# EAGLE board MeadowF7Micro_REVB (EAGLE 9.3.2), part 1 of 2
uMeadow eval Kit.
DATE: 09/16/2018; ENGINEER: S.JOHNSON; PART_NUMBER: uMeadow; REV: A
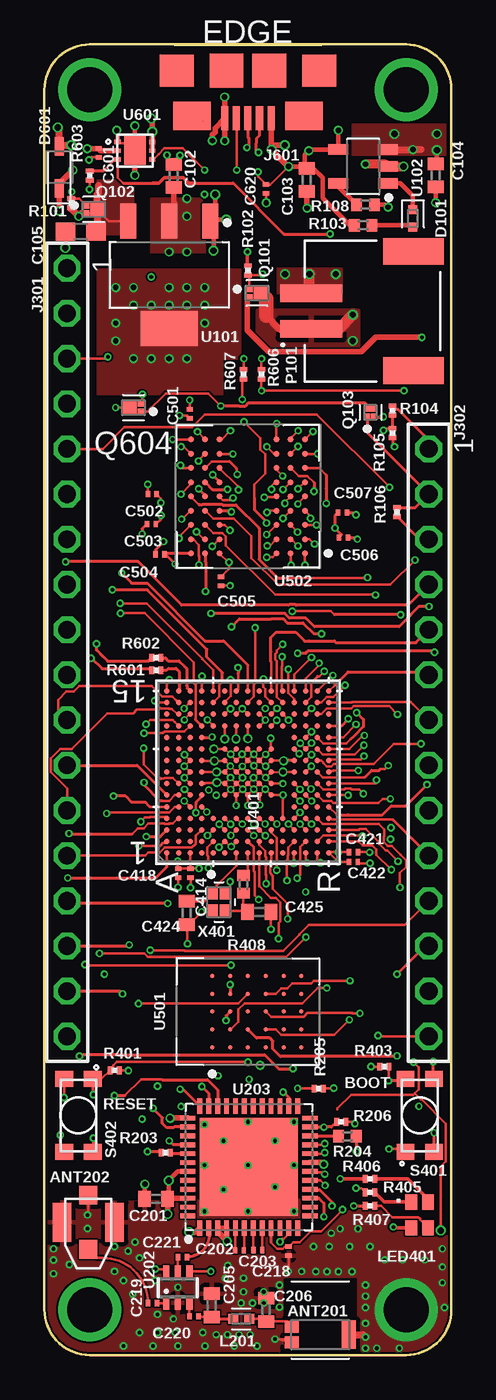
[diagram p0: board, top side]
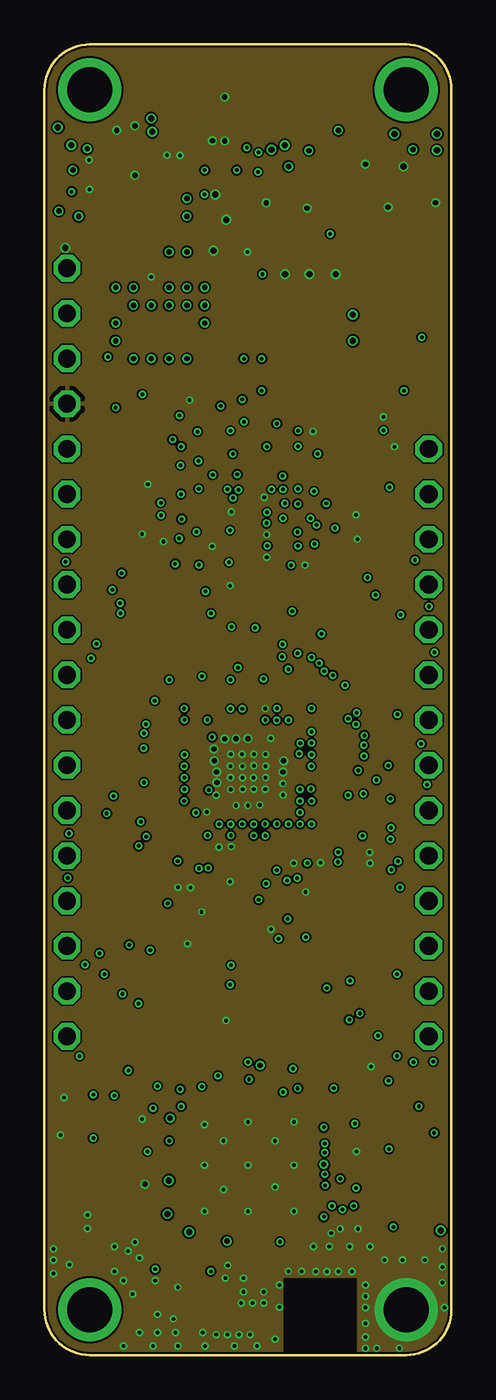
[diagram p1: board, inner layer Route2]
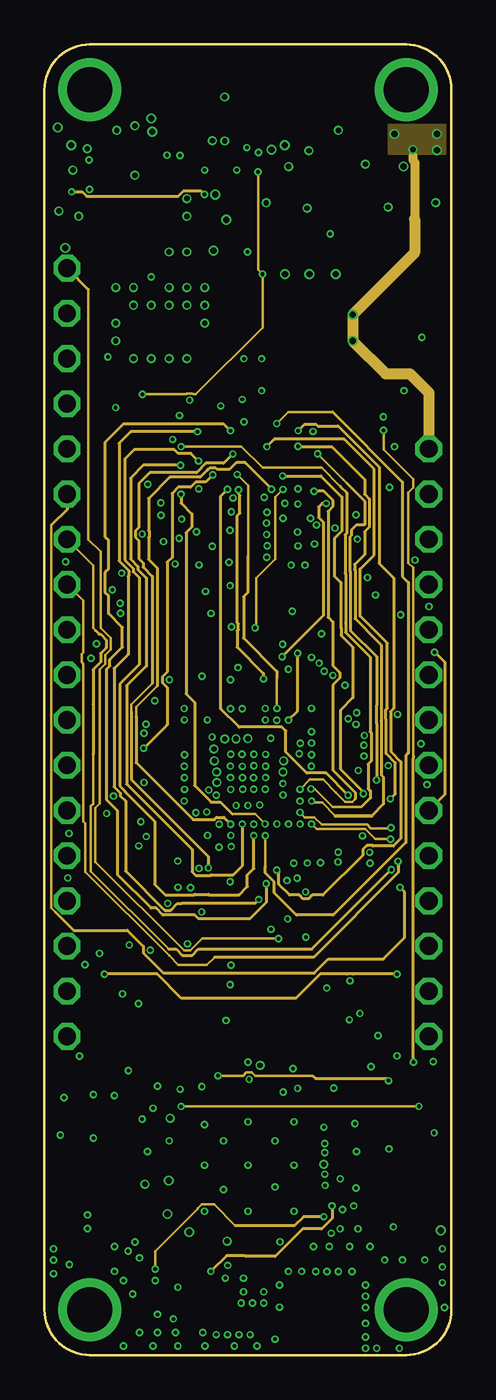
[diagram p2: board, inner layer Route3]
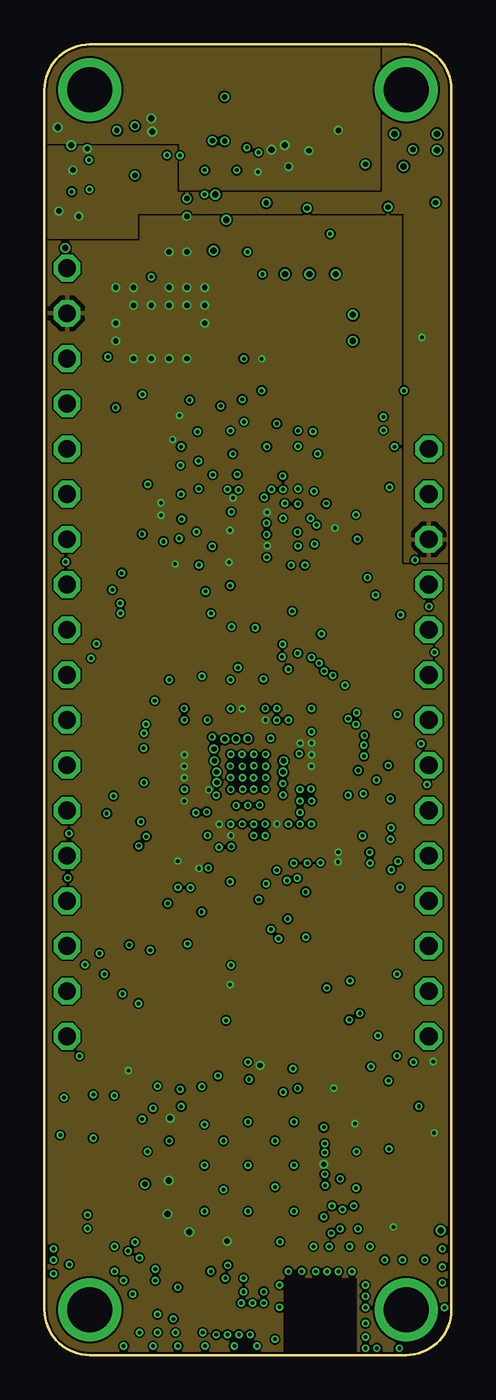
[diagram p3: board, inner layer Route14]
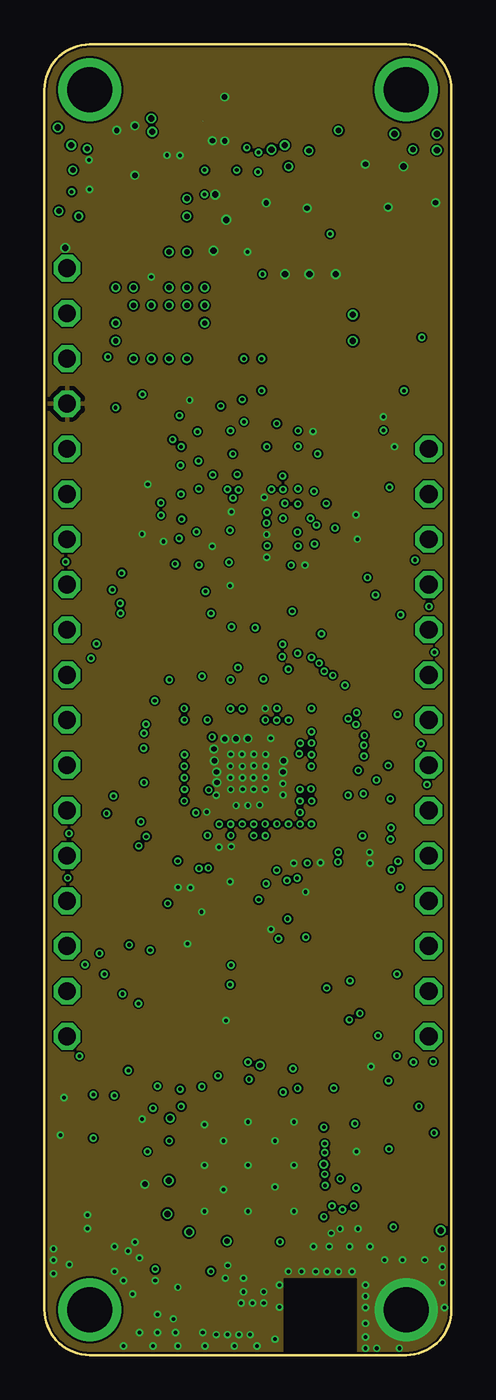
[diagram p4: board, inner layer Route15]
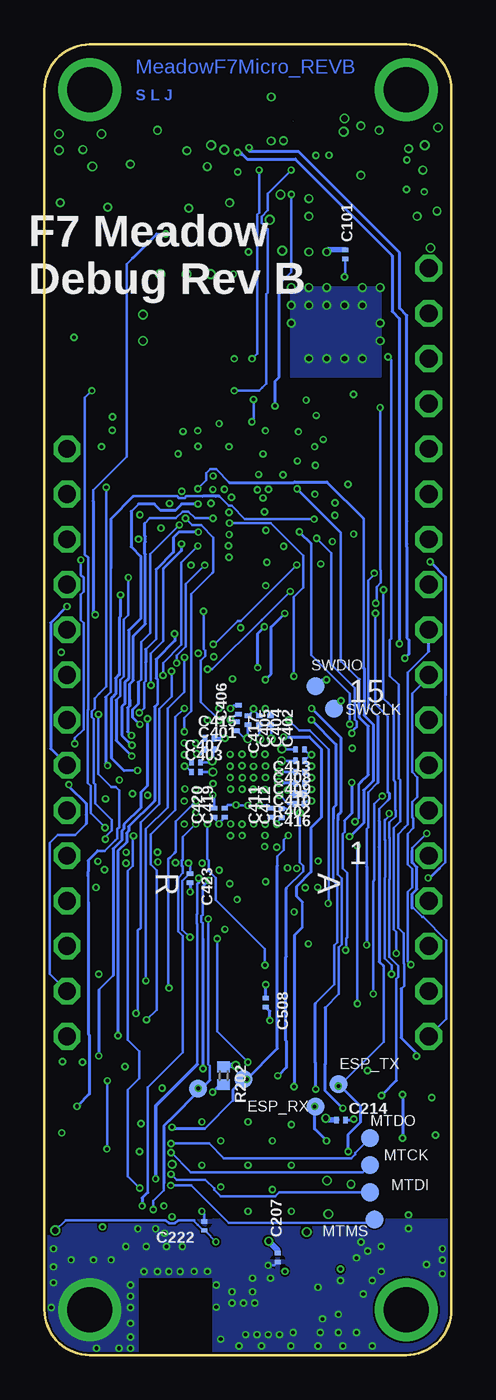
[diagram p5: board, bottom side, seen from below]

Size 22.86 x 73.66 mm. Coordinates in mm from the lower left corner, seen from the top.
Outline: 0,71.12 0,2.54 arc90 2.54,0 20.32,0 arc90 22.86,2.54 22.86,71.12 arc90 20.32,73.66 2.54,73.66 arc90 0,71.12
Copper layers (1*2+3*14+15*16): Top 0.035mm / dielectric 0.15mm / Route2 0.035mm / dielectric 0.15mm / Route3 0.035mm / dielectric 0.3mm / Route14 0.035mm / dielectric 0.15mm / Route15 0.035mm / dielectric 0.15mm / Bottom 0.035mm
Design rules "default *": minimum track width 5mil, minimum drill 0.2mm, track to track 0.1mm, track to pad 0.1mm, pad to pad 4mil, via to via 4mil, smd to smd 0mil, copper to edge 0.1mm, drill to drill 6mil, minimum pad ring 0.1mm, minimum via ring 4mil, stop-mask expansion 1mil, vias tented up to drill 20mil, thermal gap 10mil
Net classes: 1 USB: width 0.165 mm, drill 0.102 mm, clearance 0.254 mm; 2 MEM_ADDR_CNT: width 0.102 mm, drill 0.102 mm; 3 MEM_DATA: width 0.102 mm; 4 5V: width 0.1 mm; 5 50ohm: width 0.1 mm; 6 POWER: width 0.1 mm, drill 0.203 mm; 7 CLK: width 0.1 mm, drill 0.203 mm; 8 ANT: clearance 0.3 mm

## Footprints (pad centres in the part's own frame; a part is rotated, then mirrored left to right if it is on the bottom)
W3008 = smd 0.8 x 0.65: 1 1.6,-0.425; 2 1.6,0.425 | smd 0.8 x 1.6: 3 -1.6,0
A-1JB = smd 2.2 x 1.05: GND 0,1.475; GND2 0,-1.475 | smd 1.05 x 1: GND1 -1.525,0; SIG 1.525,0
C0201 = smd 0.25 x 0.35: 1 -0.25,0; 2 0.25,0
C0402 = smd 0.7 x 0.9: 1 -0.65,0; 2 0.65,0
C0603 = smd 1.1 x 1: 1 -0.85,0; 2 0.85,0
LEDC1005X50 = smd 0.5 x 0.5: 1 -0.5,0; 2 0.5,0
SOD2512X117 = smd 1.054 x 0.53: 1 -1.181,0; 2 1.181,0
TSW-118-XX-G-S = drill 1 pad 1.5 octagon: 1 21.59,0; 2 19.05,0; 3 16.51,0; 4 13.97,0; 5 11.43,0; 6 8.89,0; 7 6.35,0; 8 3.81,0; 9 1.27,0; 10 -1.27,0; 11 -3.81,0; 12 -6.35,0; 13 -8.89,0; 14 -11.43,0; 15 -13.97,0; 16 -16.51,0; 17 -19.05,0; 18 -21.59,0
TSW-114-XX-G-S = drill 1 pad 1.5 octagon: 1 16.51,0; 2 13.97,0; 3 11.43,0; 4 8.89,0; 5 6.35,0; 6 3.81,0; 7 1.27,0; 8 -1.27,0; 9 -3.81,0; 10 -6.35,0; 11 -8.89,0; 12 -11.43,0; 13 -13.97,0; 14 -16.51,0
USB_OTG = smd 0.4 x 1.35: 1 -1.3,2.675; 2 -0.65,2.675; 3 0,2.675; 4 0.65,2.675; 5 1.3,2.675 | smd 2.1 x 1.6: SHD1 3.15,2.55; SHD2 -3.15,2.55 | smd 1.9 x 1.9: SHD3 1.2,0; SHD4 -1.2,0 | smd 1.9 x 1.8: SHD5 -4,0; SHD6 4,0
L0402 = smd 0.556 x 0.559: 1 -0.452,0; 2 0.452,0
LTST-C19HE1WT = smd 0.65 x 0.85: 1 -0.475,0.725; 2 0.475,0.725; 3 0.475,-0.725; 4 -0.475,-0.725
MTH_100_140MIL = drill 2.54 pad 3.556: 1 0,0
JST_S2B-PH-SM4-TB(LF)(SN) = smd 1 x 3.5: 1 1,0; 2 -1,0 | smd 1.5 x 3.4: P1 3.35,5.75; P2 -3.35,5.75
DFN120X80X50-3 = smd 0.36 x 0.35: 1 -0.42,0.225; 2 -0.42,-0.225 | smd 0.76 x 0.772: 3 0.195,0
DFN80X60X40-3 = smd 0.35 x 0.3: 1 -0.245,0.175; 2 -0.245,-0.175 | smd 0.35 x 0.65: 3 0.22,0
R0201 = smd 0.28 x 0.43: 1 -0.255,0; 2 0.255,0
R0402 = smd 0.6 x 0.7: 1 -0.5,0; 2 0.5,0
KMR211NG = smd 0.9 x 1: 1 -2.05,0.8; 2 2.05,0.8; 3 2.05,-0.8; 4 -2.05,-0.8
TP_SMT_40MIL = smd 1.016 x 1.016: 1 0,0
SOT230P700X180-4 = smd 1.965 x 0.889: 1 -3.023,2.3; 2 -3.023,0; 3 -3.023,-2.3 | smd 1.965 x 3.189: 4 3.023,0
SOT95P270X145-5 = smd 1.1 x 0.6: 1 -1.4,0.95; 2 -1.4,0; 3 -1.4,-0.95; 4 1.4,-0.95; 5 1.4,0.95
SC70-6L = smd 0.35 x 0.8: 1 -0.65,-0.85; 2 0,-0.85; 3 0.65,-0.85; 4 0.65,0.85; 5 0,0.85; 6 -0.65,0.85
QFN50P700X700X104-49T550 = smd 0.866 x 0.27: 1 -3.432,2.75; 2 -3.432,2.25; 3 -3.432,1.75; 4 -3.432,1.25; 5 -3.432,0.75; 6 -3.432,0.25; 7 -3.432,-0.25; 8 -3.432,-0.75; 9 -3.432,-1.25; 10 -3.432,-1.75; 11 -3.432,-2.25; 12 -3.432,-2.75; 25 3.432,-2.75; 26 3.432,-2.25; 27 3.432,-1.75; 28 3.432,-1.25; 29 3.432,-0.75; 30 3.432,-0.25; 31 3.432,0.25; 32 3.432,0.75; 33 3.432,1.25; 34 3.432,1.75; 35 3.432,2.25; 36 3.432,2.75 | smd 0.27 x 0.866: 13 -2.75,-3.432; 14 -2.25,-3.432; 15 -1.75,-3.432; 16 -1.25,-3.432; 17 -0.75,-3.432; 18 -0.25,-3.432; 19 0.25,-3.432; 20 0.75,-3.432; 21 1.25,-3.432; 22 1.75,-3.432; 23 2.25,-3.432; 24 2.75,-3.432; 37 2.75,3.432; 38 2.25,3.432; 39 1.75,3.432; 40 1.25,3.432; 41 0.75,3.432; 42 0.25,3.432; 43 -0.25,3.432; 44 -0.75,3.432; 45 -1.25,3.432; 46 -1.75,3.432; 47 -2.25,3.432; 48 -2.75,3.432 | smd 5.5 x 5.5: 49 0,0
UFBGA-176 = smd 0.3 x 0.3: A1 -4.55,4.55; A2 -3.9,4.55; A3 -3.25,4.55; A4 -2.6,4.55; A5 -1.95,4.55; A6 -1.3,4.55; A7 -0.65,4.55; A8 0,4.55; A9 0.65,4.55; A10 1.3,4.55; A11 1.95,4.55; A12 2.6,4.55; A13 3.25,4.55; A14 3.9,4.55; A15 4.55,4.55; B1 -4.55,3.9; B2 -3.9,3.9; B3 -3.25,3.9; B4 -2.6,3.9; B5 -1.95,3.9; B6 -1.3,3.9; B7 -0.65,3.9; B8 0,3.9; B9 0.65,3.9; B10 1.3,3.9; B11 1.95,3.9; B12 2.6,3.9; B13 3.25,3.9; B14 3.9,3.9; B15 4.55,3.9; C1 -4.55,3.25; C2 -3.9,3.25; C3 -3.25,3.25; C4 -2.6,3.25; C5 -1.95,3.25; C6 -1.3,3.25; C7 -0.65,3.25; C8 0,3.25; C9 0.65,3.25; C10 1.3,3.25; C11 1.95,3.25; C12 2.6,3.25; C13 3.25,3.25; C14 3.9,3.25; C15 4.55,3.25; D1 -4.55,2.6; D2 -3.9,2.6; D3 -3.25,2.6; D4 -2.6,2.6; D5 -1.95,2.6; D6 -1.3,2.6; D7 -0.65,2.6; D8 0,2.6; D9 0.65,2.6; D10 1.3,2.6; D11 1.95,2.6; D12 2.6,2.6; D13 3.25,2.6; D14 3.9,2.6; D15 4.55,2.6; E1 -4.55,1.95; E2 -3.9,1.95; E3 -3.25,1.95; E4 -2.6,1.95; E12 2.6,1.95; E13 3.25,1.95; E14 3.9,1.95; E15 4.55,1.95; F1 -4.55,1.3; F2 -3.9,1.3; F3 -3.25,1.3; F4 -2.6,1.3; F6 -1.3,1.3; F7 -0.65,1.3; F8 0,1.3; F9 0.65,1.3; F10 1.3,1.3; F12 2.6,1.3; F13 3.25,1.3; F14 3.9,1.3; F15 4.55,1.3; G1 -4.55,0.65; G2 -3.9,0.65; G3 -3.25,0.65; G4 -2.6,0.65; G6 -1.3,0.65; G7 -0.65,0.65; G8 0,0.65; G9 0.65,0.65; G10 1.3,0.65; G12 2.6,0.65; G13 3.25,0.65; G14 3.9,0.65; G15 4.55,0.65; H1 -4.55,0; H2 -3.9,0; H3 -3.25,0; H4 -2.6,0; H6 -1.3,0; H7 -0.65,0; H8 0,0; H9 0.65,0; H10 1.3,0; H12 2.6,0; H13 3.25,0; H14 3.9,0; H15 4.55,0; J1 -4.55,-0.65; J2 -3.9,-0.65; J3 -3.25,-0.65; J4 -2.6,-0.65; J6 -1.3,-0.65; J7 -0.65,-0.65; J8 0,-0.65; J9 0.65,-0.65; J10 1.3,-0.65; J12 2.6,-0.65; J13 3.25,-0.65; J14 3.9,-0.65; J15 4.55,-0.65; K1 -4.55,-1.3; K2 -3.9,-1.3; K3 -3.25,-1.3; K4 -2.6,-1.3; K6 -1.3,-1.3; K7 -0.65,-1.3; K8 0,-1.3; K9 0.65,-1.3; K10 1.3,-1.3; K12 2.6,-1.3; K13 3.25,-1.3; K14 3.9,-1.3; K15 4.55,-1.3; L1 -4.55,-1.95; L2 -3.9,-1.95; L3 -3.25,-1.95; L4 -2.6,-1.95; L12 2.6,-1.95; L13 3.25,-1.95; L14 3.9,-1.95; L15 4.55,-1.95; M1 -4.55,-2.6; M2 -3.9,-2.6; M3 -3.25,-2.6; M4 -2.6,-2.6; M5 -1.95,-2.6; M6 -1.3,-2.6; M7 -0.65,-2.6; M8 0,-2.6; M9 0.65,-2.6; M10 1.3,-2.6; M11 1.95,-2.6; M12 2.6,-2.6; M13 3.25,-2.6; M14 3.9,-2.6; M15 4.55,-2.6; N1 -4.55,-3.25; N2 -3.9,-3.25; N3 -3.25,-3.25; N4 -2.6,-3.25; N5 -1.95,-3.25; N6 -1.3,-3.25; N7 -0.65,-3.25; N8 0,-3.25; N9 0.65,-3.25; N10 1.3,-3.25; N11 1.95,-3.25; N12 2.6,-3.25; N13 3.25,-3.25; N14 3.9,-3.25; N15 4.55,-3.25; P1 -4.55,-3.9; P2 -3.9,-3.9; P3 -3.25,-3.9; P4 -2.6,-3.9; P5 -1.95,-3.9; P6 -1.3,-3.9; P7 -0.65,-3.9; P8 0,-3.9; P9 0.65,-3.9; P10 1.3,-3.9; P11 1.95,-3.9; P12 2.6,-3.9; P13 3.25,-3.9; P14 3.9,-3.9; P15 4.55,-3.9; R1 -4.55,-4.55; R2 -3.9,-4.55; R3 -3.25,-4.55; R4 -2.6,-4.55; R5 -1.95,-4.55; R6 -1.3,-4.55; R7 -0.65,-4.55; R8 0,-4.55; R9 0.65,-4.55; R10 1.3,-4.55; R11 1.95,-4.55; R12 2.6,-4.55; R13 3.25,-4.55; R14 3.9,-4.55; R15 4.55,-4.55
BGA25C100P5X5_800X600X120 = smd 0.25 x 0.25: A1 -2,2; A2 -1,2; A3 0,2; A4 1,2; A5 2,2; B1 -2,1; B2 -1,1; B3 0,1; B4 1,1; B5 2,1; C1 -2,0; C2 -1,0; C3 0,0; C4 1,0; C5 2,0; D1 -2,-1; D2 -1,-1; D3 0,-1; D4 1,-1; D5 2,-1; E1 -2,-2; E2 -1,-2; E3 0,-2; E4 1,-2; E5 2,-2; P$1 -2,-3; P$2 -1,-3; P$3 0,-3; P$4 1,-3; P$5 2,-3
BGA81C80P9X9_800X800X120 = smd 0.35 x 0.35: A1 -3.2,3.2; A2 -2.4,3.2; A3 -1.6,3.2; A7 1.6,3.2; A8 2.4,3.2; A9 3.2,3.2; B1 -3.2,2.4; B2 -2.4,2.4; B3 -1.6,2.4; B7 1.6,2.4; B8 2.4,2.4; B9 3.2,2.4; C1 -3.2,1.6; C2 -2.4,1.6; C3 -1.6,1.6; C7 1.6,1.6; C8 2.4,1.6; C9 3.2,1.6; D1 -3.2,0.8; D2 -2.4,0.8; D3 -1.6,0.8; D7 1.6,0.8; D8 2.4,0.8; D9 3.2,0.8; E1 -3.2,0; E2 -2.4,0; E3 -1.6,0; E7 1.6,0; E8 2.4,0; E9 3.2,0; F1 -3.2,-0.8; F2 -2.4,-0.8; F3 -1.6,-0.8; F7 1.6,-0.8; F8 2.4,-0.8; F9 3.2,-0.8; G1 -3.2,-1.6; G2 -2.4,-1.6; G3 -1.6,-1.6; G7 1.6,-1.6; G8 2.4,-1.6; G9 3.2,-1.6; H1 -3.2,-2.4; H2 -2.4,-2.4; H3 -1.6,-2.4; H7 1.6,-2.4; H8 2.4,-2.4; H9 3.2,-2.4; J1 -3.2,-3.2; J2 -2.4,-3.2; J3 -1.6,-3.2; J7 1.6,-3.2; J8 2.4,-3.2; J9 3.2,-3.2
U-DFN2018-6 = smd 0.35 x 0.25: 1 -0.975,0.5; 2 -0.975,0; 3 -0.975,-0.5; 4 0.975,-0.5; 5 0.975,0; 6 0.975,0.5 | smd 1.2 x 1.6: TAB 0,0
OSCCC160X120X40 = smd 0.73 x 0.58: 1 -0.5,-0.35; 2 0.5,-0.35; 3 0.5,0.35; 4 -0.5,0.35

## Placement (x,y rotation side)
ANT201  w3008  [W3008]  15.49,1.14 180 top
ANT202  A-1JB  [A-1JB]  2.46,7.47 270 top
C101  0.1uF  [C0201]  5.96,61.87 270 bottom
C102  10uF  [C0402]  7.26,66.27 90 top
C103  4.7uF  [C0402]  14.73,66.04 270 top
C104  4.7uF  [C0402]  21.97,66.29 270 top
C105  10uF  [C0603]  2.03,63.14 180 top
C201  10uF  [C0402]  6.27,8.79 180 top
C202  0.1uF  [C0201]  10.95,5.88 0 top
C203  0.1uF  [C0201]  11.98,5.9 0 top
C205  6pF  [C0402]  9.4,2.79 90 top
C206  1.8pF  [C0402]  12.45,2.54 90 top
C207  0.1uF  [C0201]  9.76,5.49 270 bottom
C214  0.1uF  [C0201]  6.2,13.21 0 bottom
C218  0.1uF  [C0201]  13.72,5.84 270 top
C219  100pF  [C0201]  6.07,2.92 0 top
C220  100pF  [C0201]  8.41,2.18 180 top
C221  100pF  [C0201]  7.75,5.51 0 top
C222  0.1uF  [C0201]  13.89,7.26 90 bottom
C401  2.2uF  [C0201]  13.59,34.04 0 bottom
C402  2.2uF  [C0201]  10.16,35.69 270 bottom
C403  0.1uF  [C0201]  14.35,32.77 0 bottom
C404  1uF  [C0201]  10.79,35.69 270 bottom
C405  0.1uF  [C0201]  11.42,35.68 270 bottom
C406  0.1uF  [C0201]  11.97,36.27 90 bottom
C407  0.1uF  [C0201]  14.35,33.31 0 bottom
C408  0.1uF  [C0201]  8.51,33.4 180 bottom
C409  0.1uF  [C0201]  8.51,32.77 180 bottom
C410  0.1uF  [C0201]  8.51,32.13 180 bottom
C411  0.1uF  [C0201]  10.13,30.49 90 bottom
C412  0.1uF  [C0201]  9.53,30.46 90 bottom
C413  0.1uF  [C0201]  8.51,34.04 180 bottom
C414  0.1uF  [C0201]  8.2,27.09 270 top
C415  0.1uF  [C0201]  13.59,34.67 0 bottom
C416  0.1uF  [C0201]  8.52,30.97 180 bottom
C417  0.1uF  [C0201]  12.06,35.34 270 bottom
C418  0.1uF  [C0201]  7.51,27.09 270 top
C419  1uF  [C0201]  12.73,30.49 90 bottom
C420  0.1uF  [C0201]  13.34,30.48 90 bottom
C421  0.1uF  [C0201]  17.35,28.26 0 top
C422  1uF  [C0201]  17.35,27.72 0 top
C423  0.1uF  [C0201]  14.68,26.79 270 bottom
C424  8pF  [C0402]  8,24.85 270 top
C425  8pF  [C0402]  12.06,24.89 0 top
C501  0.1uF  [C0201]  8.16,52.91 90 top
C502  0.1uF  [C0201]  6.05,48.39 180 top
C503  0.1uF  [C0201]  6,46.7 180 top
C504  1uF  [C0201]  6.49,45 180 top
C505  0.1uF  [C0201]  9.92,43.49 270 top
C506  1uF  [C0201]  16.79,45.94 0 top
C507  0.1uF  [C0201]  16.74,47.35 0 top
C508  0.1uF  [C0201]  10.43,19.8 270 bottom
C601  0.1uF  [C0201]  3.05,67.56 270 top
C620  4.7uF  [C0201]  12.45,65.53 270 top
D101  QBLP595-O  [LEDC1005X50]  20.7,63.88 270 top
D601  BAT60JFILM  [SOD2512X117]  0.83,66.75 90 top
DRILEGEND  [DRILEGEND]  -118.04,-61.67 0 top  (outside the outline)
J301  TSW-118-07-G-S  [TSW-118-XX-G-S]  1.27,39.5 90 top
J302  TSW-114-07-G-S  [TSW-114-XX-G-S]  21.59,34.42 90 top
J601  USB_OTG_ZX62-AB-5PA  [USB_OTG]  11.43,72.19 180 top
L201  0 Ohm  [L0402]  11.05,2.03 180 top
LED401  LTST-C19HE1WT  [LTST-C19HE1WT]  21.08,7.87 0 top
MTH1  100MIL_140MIL  [MTH_100_140MIL]  2.54,2.54 0 top
MTH2  100MIL_140MIL  [MTH_100_140MIL]  20.32,2.54 0 top
MTH3  100MIL_140MIL  [MTH_100_140MIL]  2.54,71.12 0 top
MTH4  100MIL_140MIL  [MTH_100_140MIL]  20.32,71.12 0 top
P101  S2B-PH-SM4-TB(LF)(SN)  [JST_S2B-PH-SM4-TB(LF)(SN)]  14.99,58.67 270 top
Q101  SSM3J46CTB  [DFN120X80X50-3]  11.94,59.69 0 top
Q102  SSM3J46CTB  [DFN120X80X50-3]  2.77,64.39 0 top
Q103  RV1C002UNT2CL_NCH  [DFN80X60X40-3]  18.31,52.98 90 top
Q604  SSM3J46CTB  [DFN120X80X50-3]  5,53.25 180 top
R101  10K  [R0201]  1.5,64.75 90 top
R102  10K  [R0201]  11.43,60.96 270 top
R103  1K  [R0402]  17.91,63.5 0 top
R104  499K  [R0201]  19.56,53.09 90 top
R105  499K  [R0201]  19.56,51.82 90 top
R106  10K  [R0201]  19.81,47.37 90 top
R108  4.7K  [R0402]  18.03,64.64 0 top
R202  00  [R0402]  12.8,15.7 270 bottom
R203  499  [R0201]  6.81,11.38 180 top
R204  20K  [R0201]  16.66,13.11 180 top
R205  10K  [R0201]  15.41,14.98 0 top
R206  10k  [R0402]  17.02,12.29 0 top
R401  10K  [R0201]  3.94,16 0 top
R402  10K  [R0201]  8.52,31.52 180 bottom
R403  10K  [R0201]  19.1,16.21 0 top
R405  620  [R0201]  18.29,9.14 0 top
R406  300  [R0201]  18.29,9.91 0 top
R407  300  [R0201]  18.29,8.38 0 top
R408  00  [R0402]  11.18,26.45 90 top
R601  0R  [R0201]  6.28,38.49 180 top
R602  0R  [R0201]  6.27,39.18 180 top
R603  10K  [R0201]  2.54,66.29 90 top
R606  47K  [R0201]  12.19,55.12 90 top
R607  0R  [R0201]  11.18,55.12 90 top
S401  SPST_SW_KMR211NG_LFS  [KMR211NG]  21.08,13.46 90 top
S402  SPST_SW_KMR211NG_LFS  [KMR211NG]  1.91,13.46 270 top
TP201  TP_SMT_40MIL  [TP_SMT_40MIL]  4.57,10.67 0 bottom
TP202  TP_SMT_40MIL  [TP_SMT_40MIL]  11.68,15.49 0 bottom
TP203  TP_SMT_40MIL  [TP_SMT_40MIL]  4.57,9.14 0 bottom
TP204  TP_SMT_40MIL  [TP_SMT_40MIL]  4.57,12.19 0 bottom
TP205  TP_SMT_40MIL  [TP_SMT_40MIL]  4.32,7.62 0 bottom
TP206  TP_SMT_40MIL  [TP_SMT_40MIL]  14.22,14.99 0 bottom
TP207  TP_SMT_40MIL  [TP_SMT_40MIL]  7.62,13.97 0 bottom
TP208  TP_SMT_40MIL  [TP_SMT_40MIL]  6.35,15.24 0 bottom
TP401  TP_SMT_40MIL  [TP_SMT_40MIL]  6.6,36.32 0 bottom
TP402  TP_SMT_40MIL  [TP_SMT_40MIL]  7.62,37.59 0 bottom
U101  LM1117MPX-3.3  [SOT230P700X180-4]  7.01,60.71 270 top
U102  MCP7381-2-0T  [SOT95P270X145-5]  17.91,66.8 180 top
U202  SKYA21001  [SC70-6L]  7.49,3.78 0 top
U203  ESP32-PICO-D4  [QFN50P700X700X104-49T550]  11.48,10.57 90 top
U401  STM32F777  [UFBGA-176]  11.43,32.77 90 top
U501  32MB  [BGA25C100P5X5_800X600X120]  11.43,19.3 90 top
U502  32MB  [BGA81C80P9X9_800X800X120]  11.43,48.26 180 top
U601  AP2151  [U-DFN2018-6]  5.08,67.69 0 top
X401  ABM12W-25  [OSCCC160X120X40]  9.8,25.46 270 top

## Library data of the parts
ANT201 = SLJ_wireless; MANUFACTURER: PulseLarsen; PART_NUMBER: W3008
ANT202 = SLJ_wireless; MANUFACTURER: amphenol RF; PART_NUMBER: A-1JB
C101 = eagle-ltspice; FOOTPRINT: 0201; MANUFACTURER: Murata Electronica; PART_NUMBER: GRM033C71A104KE14D; SPICEMODEL: NONE; SPICEPREFIX: C; VOLTAGE: 10V
C102 C201 = rcl; MANUFACTURER: MURATA; PACKAGE: 0402; PART_NUMBER: GRM155R60J106ME15D; SPICEPREFIX: C
C103 C104 = rcl; MANUFACTURER: MURATA; PACKAGE: 0402; PART_NUMBER: GRM155R60J475ME87D; SPICEPREFIX: C
C105 = rcl; FOOTPRINT: 0603; MANUFACTURER: Murata Electronics North America; PART_NUMBER: GRM188R61A106ME69D; SPICEPREFIX: C; VOLTAGE: 10V
C202 C203 = eagle-ltspice; DNI: DNI; FOOTPRINT: 0201; MANUFACTURER: Murata Electronica; PART_NUMBER: GRM033R61A104ME15D; SPICEMODEL: NONE; SPICEPREFIX: C; VOLTAGE: 10V
C205 = eagle-ltspice; DNI: DNI; FOOTPRINT: 0402; MANUFACTURER: Murata Electronica; PART_NUMBER: GJM1555C1H6R0BB01D; SPICEMODEL: NONE; SPICEPREFIX: C; VOLTAGE: 50V
C206 = eagle-ltspice; FOOTPRINT: 0402; MANUFACTURER: Johanson Technology Inc.; PART_NUMBER: 500R07S1R8BV4T; SPICEMODEL: NONE; SPICEPREFIX: C; VOLTAGE: 50V
C207 C214 C218 C222 C403 C405-C418 C420 C421 C423 C501-C503 C505 C507 C508 C601 = eagle-ltspice; FOOTPRINT: 0201; MANUFACTURER: Murata Electronica; PART_NUMBER: GRM033R61A104ME15D; SPICEMODEL: NONE; SPICEPREFIX: C; VOLTAGE: 10V
C219 C220 = eagle-ltspice; FOOTPRINT: 0201; MANUFACTURER: MURATA; PART_NUMBER: GRM0335C1H101JA01D; SPICEMODEL: NONE; SPICEPREFIX: C; VOLTAGE: 10V
C221 = eagle-ltspice; FOOTPRINT: 0201; MANUFACTURER: Murata; PART_NUMBER: GRM0335C1H101JA01D; SPICEMODEL: NONE; SPICEPREFIX: C; VOLTAGE: 10V
C401 C402 = eagle-ltspice; FOOTPRINT: 0201; MANUFACTURER: Murata Electronica; PART_NUMBER: GRM033R61A225KE47D; SPICEMODEL: NONE; SPICEPREFIX: C; VOLTAGE: 10V
C404 C419 C422 C504 C506 = eagle-ltspice; FOOTPRINT: 0201; MANUFACTURER: Murata Electronica; PART_NUMBER: GRT033R60J105ME13D; SPICEMODEL: NONE; SPICEPREFIX: C; VOLTAGE: 6.3V
C424 C425 = eagle-ltspice; FOOTPRINT: 0402; MANUFACTURER: Murata Electronica; PART_NUMBER: GRM1555C1H8R0DA01D; SPICEMODEL: NONE; SPICEPREFIX: C; VOLTAGE: 50V
C620 = eagle-ltspice; FOOTPRINT: 0201; MANUFACTURER: Murata Electronica; PART_NUMBER: GRM035R60J475ME15D; SPICEMODEL: NONE; SPICEPREFIX: C; VOLTAGE: 6.3V
D101 = SLJ_Diodes; COLOR: ORANGE; MANUFACTURER: QT BRIGHTEK; PART_NUMBER: QBLP595-O
D601 = SLJ_Diodes; MANUFACTURER: STMicroelectronics; PART_NUMBER: BAT60JFILM
DRILEGEND = drilegend
J301 = con-samtec; DNI: DNI; MANUFACTURER: Samtec; MF: Samtec Inc.; MPN: TSW-118-07-G-S; PART_NUMBER: TSW-118-07-G-S
J302 = con-samtec; DNI: DNI; MF: Samtec Inc.; MPN: TSW-114-07-G-S
J601 = SLJ_Connectors; MANUFACTURER: Hirose Electric Co.; PART_NUMBER: ZX62-AB-5PA(31)
L201 = SLJ_passives; CURRENT: 300mA; FOOTPRINT: 0402; MANUFACTURER: Panasonic; PART_NUMBER: ERJ-2GE0R00X
LED401 = SLJ_Diodes; MANUFACTURER: LITE-ON; PART_NUMBER: LTST-C19HE1WT
MTH1-MTH4 TP201-TP208 TP401 TP402 = SLJ_MECH; DNI: DNI
P101 = SLJ_Connectors; DESCRIPTION: PH Series 2 Position 2 mm Pitch Surface Mount Side Entry Shrouded Header; MANUFACTURER: JST; PACKAGE: FakePackage u; PART_NUMBER: S2B-PH-SM4-TB_LF__SN_; PRICE: None
Q101 Q102 Q604 = SLJ_TRANSISTORS; CURRENT: 2A; MANUFACTURER: Toshiba Semiconductor; PART_NUMBER: SSM3J46CTB(TPL3); VOLTAGE: 20V
Q103 = SLJ_TRANSISTORS; MANUFACTURER: Rohm Semiconductor; PART_NUMBER: RV1C002UNT2CL
R101 R106 = rcl; FOOTPRINT: 0201; MANUFACTURER: Panasonic; PART_NUMBER: RC0201FR-0710KL; SPICEPREFIX: R
R102 R205 R401-R403 R603 = rcl; FOOTPRINT: 0201; MANUFACTURER: Yageo; PART_NUMBER: RC0201FR-0710KL; SPICEPREFIX: R
R103 = rcl; FOOTPRINT: 0402; MANUFACTURER: VISHAY; PART_NUMBER: MCS04020C1001FE000; SPICEPREFIX: R
R104 R105 = rcl; FOOTPRINT: 0201; MANUFACTURER: Yageo; PART_NUMBER: RC0201FR-07499KL; SPICEPREFIX: R
R108 = rcl; FOOTPRINT: 0402; MANUFACTURER: Panasonic; PART_NUMBER: ERA-2AEB472X; SPICEPREFIX: R
R202 = rcl; DNI: DNI; FOOTPRINT: 0402; MANUFACTURER: Panasonic; PART_NUMBER: ERJ-2GE0R00X; SPICEPREFIX: R
R203 = rcl; FOOTPRINT: 0201; MANUFACTURER: PANASONIC; PART_NUMBER: ERJ-1GNF4990C; SPICEPREFIX: R
R204 = rcl; FOOTPRINT: 0201; MANUFACTURER: YAGEO; PART_NUMBER: RC0201FR-0720KL; SPICEPREFIX: R
R206 = rcl; DNI: DNI; FOOTPRINT: 0402; MANUFACTURER: Stackpole; PART_NUMBER: RMCF0402FT10K0; SPICEPREFIX: R
R405 = rcl; FOOTPRINT: 0201; MANUFACTURER: Yageo; PART_NUMBER: RC0201JR-07620RL; SPICEPREFIX: R
R406 R407 = rcl; FOOTPRINT: 0201; MANUFACTURER: Yageo; PART_NUMBER: RC0201FR-07300RL; SPICEPREFIX: R
R408 = rcl; FOOTPRINT: 0402; MANUFACTURER: Panasonic; PART_NUMBER: ERJ-2GE0R00X; SPICEPREFIX: R
R601 R602 R607 = rcl; FOOTPRINT: 0201; MANUFACTURER: Panasonic; PART_NUMBER: ERJ-1GN0R00C; SPICEPREFIX: R
R606 = rcl; FOOTPRINT: 0201; MANUFACTURER: Samsung Electro-Mechanics; PART_NUMBER: RC0603F473CS; SPICEPREFIX: R
S401 S402 = SLJ_SWITCHES; MANUFACTURER: C&K; PART_NUMBER: KMR211NG LFS
U101 = SLJ_PMIC; MANUFACTURER: Texas Instruments; PART_NUMBER: LM1117MPX-3.3/NOPB
U102 = SLJ_PMIC; MANUFACTURER: MicroChip; PART_NUMBER: MCP73831T-2ACI/OT
U202 = SLJ_wireless; MANUFACTURER: Skyworks Solutions; PART_NUMBER: SKYA21001
U203 = SLJ_wireless; MANUFACTURER: Espressif Systems; PART_NUMBER: ESP32-PICO-D4
U401 = STM32_MCU; MANUFACTURER: STMicroelectronics; PART_NUMBER: STM32F777IIK6
U501 = SLJ_Memory; MANUFACTURER: Cypress Semiconductor; PART_NUMBER: S25FL256LAGBHV030
U502 = SLJ_Memory; MANUFACTURER: ISSI; PART_NUMBER: IS42S16160J-7BLI; VOLTAGE: 3.3V
U601 = SLJ_PMIC; MANUFACTURER: Diodes Inc; PART_NUMBER: AP2151DFMG-7
X401 = SLJ_OSC; MANUFACTURER: Abracon LLC; PART_NUMBER: ABM12W-25.0000MHZ-6-B1U-T3

## Nets
+3V3 [POWER]: C101.1 C102.1 C201.1 C207.1 C214.1 C403.1 C404.1 C405.1 C406.1 C407.1 C408.1 C409.1 C410.1 C411.1 C412.1 C413.1 C414.1 C415.1 C416.1 C417.1 C418.1 C419.1 C420.1 C421.1 C422.1 C501.1 C502.1 C503.1 C504.1 C505.1 C506.1 C507.1 C508.1 J301.2 LED401.4 R202.1 R204.1 R205.2 R401.2 R402.2 R606.2 S401.3 S401.4 U101.2 U101.4 U203.1 U203.3 U203.4 U203.19 U203.37 U203.43 U203.46 U401.C1 U401.C5 U401.C7 U401.C8 U401.C9 U401.F3 U401.G3 U401.G13 U401.H13 U401.J12 U401.J13 U401.K4 U401.N8 U401.N9 U401.N10 U401.R1 U501.B4 U502.A7 U502.A9 U502.B3 U502.C7 U502.D3 U502.E7 U502.J9
+5V [5V]: C601.1 D601.1 J302.3 Q101.2 Q102.2 R101.1 R106.1 U601.2
+VBAT [CLK]: C104.1 J302.1 P101.1 Q101.3 R104.2 U102.3
+VBUS [POWER]: C103.1 C620.1 D601.2 J601.1 Q101.1 Q604.2 R102.2 R103.1 U102.4 U601.5 U601.6
+VREF [MEM_DATA]: C423.1 J301.3 U401.N1
ADC1_IN3 [MEM_DATA]: J301.7 U401.R2
ADC1_IN7 [MEM_DATA]: J301.8 U401.R3
ADC1_IN10 [MEM_DATA]: J301.9 U401.M2
ADC1_IN11 [MEM_DATA]: J301.10 U401.M3
CAN1_RX [MEM_DATA]: J301.17 U401.A5
CAN1_TX [MEM_DATA]: J301.18 U401.B4
DAC_OUT1 [MEM_DATA]: J301.5 U401.N4
DAC_OUT2 [MEM_DATA]: J301.6 U401.P4
EN_3V3: J302.2 Q103.1 R106.2
EN_3V3_L: Q102.1 Q103.3 Q604.1 R101.2
ESP32:CHIP_ANT_50OHM [ANT]: C205.1 C220.1 L201.2
ESP32:ESP32_IO22: U203.39
ESP32:EXTANT_50OHM [ANT]: ANT202.SIG C219.1
ESP32:FLASH_VDD: R202.2 U203.26
ESP32:GPIO2: R206.1 U203.22
ESP32:GPIO26: U202.6 U203.15
ESP32:GPIO27: U202.4 U203.16
ESP32:LNA_50OHM [ANT]: C221.2 U203.2
ESP32:MTCK: TP201.1 U203.20
ESP32:MTDI: TP203.1 U203.18
ESP32:MTDO: TP204.1 U203.21
ESP32:MTMS: TP205.1 U203.17
ESP32:N$3: C203.2 U203.8
ESP32:N$4: C202.1 U203.5
ESP32:N$5: C202.2 U203.6
ESP32:N$7: C203.1 U203.7
ESP32:N$8 [ANT]: ANT201.1 C206.1 L201.1
ESP32:N$10: R203.1 U203.41
ESP32:N$13: C220.2 U202.3
ESP32:N$14: C219.2 U202.1
ESP32:N$15: C221.1 U202.5
ESP32_BOOT_L: R204.2 TP202.1 U203.23 U401.E3
ESP32_RESET_L: C218.1 R205.1 TP206.1 U203.9 U401.K1
ESP32_UART5: R203.2 TP208.1 U401.D12
FLASH_CLK [CLK]: U401.M6 U501.B2
FLASH_CS_L [CLK]: U401.R12 U501.C2
FMC_A0 [MEM_ADDR_CNT]: U401.E2 U502.H7
FMC_A1 [MEM_ADDR_CNT]: U401.H3 U502.H8
FMC_A2 [MEM_ADDR_CNT]: U401.H2 U502.J8
FMC_A3 [MEM_ADDR_CNT]: U401.J2 U502.J7
FMC_A4 [MEM_ADDR_CNT]: U401.J3 U502.J3
FMC_A5 [MEM_ADDR_CNT]: U401.K3 U502.J2
FMC_A6 [MEM_ADDR_CNT]: U401.P6 U502.H3
FMC_A7 [MEM_ADDR_CNT]: U401.N6 U502.H2
FMC_A8 [MEM_ADDR_CNT]: U401.R7 U502.H1
FMC_A9 [MEM_ADDR_CNT]: U401.P7 U502.G3
FMC_A10 [MEM_ADDR_CNT]: U401.N7 U502.H9
FMC_A11 [MEM_ADDR_CNT]: U401.M7 U502.G2
FMC_A12 [MEM_ADDR_CNT]: U401.L15 U502.G1
FMC_A13 [MEM_ADDR_CNT]: U502.E2
FMC_A14 [MEM_ADDR_CNT]: U401.K14 U502.G7
FMC_A15 [MEM_ADDR_CNT]: U401.K13 U502.G8
FMC_CAS_L [MEM_ADDR_CNT]: U401.B7 U502.F7
FMC_CKE_L [MEM_ADDR_CNT]: U401.F4 U502.F3
FMC_CLK [MEM_ADDR_CNT]: U401.H14 U502.F2
FMC_CS_L [MEM_ADDR_CNT]: U401.G4 U502.G9
FMC_D0 [MEM_DATA]: U401.M14 U502.A8
FMC_D1 [MEM_DATA]: U401.L14 U502.B9
FMC_D2 [MEM_DATA]: U401.B12 U502.B8
FMC_D3 [MEM_DATA]: U401.C12 U502.C9
FMC_D4 [MEM_DATA]: U401.R8 U502.C8
FMC_D5 [MEM_DATA]: U401.P8 U502.D9
FMC_D6 [MEM_DATA]: U401.P9 U502.D8
FMC_D7 [MEM_DATA]: U401.R9 U502.E9
FMC_D8 [MEM_DATA]: U401.P10 U502.E1
FMC_D9 [MEM_DATA]: U401.R10 U502.D2
FMC_D10 [MEM_DATA]: U401.N11 U502.D1
FMC_D11 [MEM_DATA]: U401.P11 U502.C2
FMC_D12 [MEM_DATA]: U401.R11 U502.C1
FMC_D13 [MEM_DATA]: U401.P15 U502.B2
FMC_D14 [MEM_DATA]: U401.P14 U502.B1
FMC_D15 [MEM_DATA]: U401.N15 U502.A2
FMC_DQMH [MEM_DATA]: U401.A3 U502.F1
FMC_DQML [MEM_DATA]: U401.A4 U502.E8
FMC_RAS_L [MEM_ADDR_CNT]: U401.R6 U502.F8
FMC_WE [MEM_ADDR_CNT]: U401.J4 U502.F9
GND [POWER]: ANT201.2 ANT201.3 ANT202.GND ANT202.GND1 ANT202.GND2 C101.2 C102.2 C103.2 C104.2 C105.2 C201.2 C205.2 C206.2 C207.2 C214.2 C218.2 C222.2 C401.2 C402.2 C403.2 C404.2 C405.2 C406.2 C407.2 C408.2 C409.2 C410.2 C411.2 C412.2 C413.2 C414.2 C415.2 C416.2 C417.2 C418.2 C419.2 C420.2 C421.2 C422.2 C423.2 C424.2 C425.2 C501.2 C502.2 C503.2 C504.2 C505.2 C506.2 C507.2 C508.2 C601.2 C620.2 J301.4 J601.5 MTH2.1 P101.2 Q103.2 R102.1 R105.1 R108.2 R206.2 R403.1 R603.1 S402.3 S402.4 U101.1 U102.2 U202.2 U203.49 U401.D5 U401.D7 U401.D8 U401.D9 U401.F2 U401.F6 U401.F7 U401.F8 U401.F9 U401.F10 U401.F12 U401.G2 U401.G6 U401.G7 U401.G8 U401.G9 U401.G10 U401.G12 U401.H6 U401.H7 U401.H8 U401.H9 U401.H10 U401.H12 U401.J6 U401.J7 U401.J8 U401.J9 U401.J10 U401.K6 U401.K7 U401.K8 U401.K9 U401.K10 U401.L4 U401.M1 U401.M8 U401.M9 U401.P1 U501.B3 U502.A1 U502.A3 U502.B7 U502.C3 U502.D7 U502.E3 U502.J1 U601.1 U601.TAB X401.2 X401.4
I2C1_SCL [MEM_DATA]: J302.11 U401.B6
I2C1_SDA [MEM_DATA]: J302.12 U401.B5
PB0 [MEM_DATA]: J302.13 U401.R5
PB1 [MEM_DATA]: J302.10 U401.R4
PC6 [MEM_DATA]: J301.16 U401.H15
PC7 [MEM_DATA]: J302.14 U401.G15
PC9 [MEM_DATA]: J302.8 U401.F14
PE3 [MEM_DATA]: J302.4 U401.A1
PG3 [MEM_DATA]: J302.5 U401.K15
PH10 [MEM_DATA]: J302.9 U401.L13
POWER1:N$1: R108.1 U102.5
POWER1:N$2: D101.1 U102.1
POWER1:N$3: D101.2 R103.2
POWER1:N$4: C105.1 Q102.3 U101.3
QUAD_SPI_IO0 [50ohm]: U401.N14 U501.D3
QUAD_SPI_IO1 [50ohm]: U401.N13 U501.D2
QUAD_SPI_IO2 [50ohm]: U401.A2 U501.C4
QUAD_SPI_IO3 [50ohm]: U401.M15 U501.D4
RESET_L [MEM_DATA]: J301.1 R401.1 S402.1 S402.2 U401.J1
SPI2_CS_L: U203.34 U401.E14
SPI2_MISO: U203.38 U401.C14
SPI2_MOSI: U203.36 U401.C13
SPI2_SCK: U203.35 U401.D11
SPI3_CLK [MEM_DATA]: J301.11 U401.B14
SPI3_MISO [MEM_DATA]: J301.13 U401.B13
SPI3_MOSI [MEM_DATA]: J301.12 U401.A6
STM32_MCU1:BLINKY_B: R407.1 U401.N3
STM32_MCU1:BLINKY_G: R406.1 U401.N2
STM32_MCU1:BLINKY_R: R405.1 U401.P2
STM32_MCU1:BOOT: R403.2 S401.1 S401.2 U401.D6
STM32_MCU1:I2C2_SCL: U401.H4
STM32_MCU1:I2C2_SDA: U401.R13
STM32_MCU1:JTDI: U401.A13
STM32_MCU1:JTDO: U401.A10
STM32_MCU1:N$1: C401.1 U401.M10
STM32_MCU1:N$2: C402.1 U401.F13
STM32_MCU1:N$7: LED401.1 R405.2
STM32_MCU1:N$8: R402.1 U401.C6
STM32_MCU1:N$9: LED401.2 R406.2
STM32_MCU1:N$11: LED401.3 R407.2
STM32_MCU1:N$14: C425.1 R408.1 X401.3
STM32_MCU1:OSC_IN_PH0: C424.1 U401.G1 X401.1
STM32_MCU1:OSC_OUT_PH1: R408.2 U401.H1
STM32_MCU1:PC8_TIM8CH1: U401.G14
STM32_MCU1:PD5_BUT: U401.C11
STM32_MCU1:SWCLK/JTCK: TP401.1 U401.A14
STM32_MCU1:SWDIO/JTMS: TP402.1 U401.A15
UART4_RX [MEM_DATA]: J301.14 U401.D3
UART4_TX [MEM_DATA]: J301.15 U401.E12
UART5_ESP32: TP207.1 U203.40 U401.P13
USART1_RX [MEM_DATA]: J302.6 U401.R15
USART1_TX [MEM_DATA]: J302.7 U401.R14
USB_ID: R607.1 U401.D15
USB_N [USB]: R602.1 U401.C15
USB_OC: R606.1 U401.M4 U601.4
USB_OTG1:USB_ID: J601.4 R607.2
USB_OTG1:USB_N [USB]: J601.2 R602.2
USB_OTG1:USB_P [USB]: J601.3 R601.2
USB_P [USB]: R601.1 U401.B15
USB_PWR_ON: R603.2 U401.K12 U601.3
VBAT_MEAS: C222.1 R104.1 R105.2 U203.11
VBUS_MCU [POWER]: Q604.3 U401.E15

## Tracks (layer width: path | path; a pad name or v marks a point on that pad's centre or on a via)
+3V3  (via drill 0.2, 0.3, 0.35)
  Top 0.102: U401.C5
  Top 0.127: C501.1 8.01,52.81 v7.59,52.81 | U502.J9 v7.2,51.46 | U502.D3 12.6,47.46 v12.5,47.36 | U502.B3 12.65,45.48 v12.52,45.48 | U502.A7 10.34,44.55 v10.37,44.55 10.37,44.19 C505.1 | U502.C7 10.12,46.66 v10.42,46.36 | v10.59,48.17 10.46,48.05 10.09,48.05 10.08,48.06 10.03,48.06 U502.E7 | U401.K4 v13.05,29.85 v13.06,29.85 | v9.82,29.83 U401.F3 | U401.F3 | U401.J12 12.39,35.67 | U401.N9 v15,33.75
  Top 0.15: C414.1 C418.1 7.48,27.36 v7.48,27.76 | C414.1 8.18,27.36 U401.C1 | C414.1 8.68,27.34 v8.69,27.35 | R606.2 v12.19,55.99 v12.2,56 | R205.2 16.23,14.98 v16.25,15
  Top 0.152: U401.G3 v10.47,29.21 v10.47,29.2 | 8.23,45.11 U502.A9 | U502.C7 9.83,46.68 | C421.1 v16.51,28.26 16.03,28.26 U401.R1 16,28.22 v16.49,27.72 v16.49,27.71 v16.5,27.72 C422.1 | R401.2 4.7,16 v4.71,15.99 | C502.1 6.54,48.15 v6.54,47.9 | U401.N8 14.99,33.08 v14.99,33.1 | v14.37,34.38 U401.N10 v15.01,34.39 | U401.C5 v7.85,31.14 | U401.J13 v12.41,35.69 U401.J12 | U401.H13 v11.12,36.33 | v11.12,36.33 v11.11,36.32 10.81,36.02 U401.G13 10.81,36.02 v11.12,36.33 | v7.86,33.74 v7.86,33.73 U401.C9 v7.86,33.09 | v7.86,33.09 v7.85,33.09 | U401.C7 v7.86,32.44 v7.86,32.45 U401.C8 v7.86,33.09 | R204.1 17.34,13.11 v17.44,13.01
  Top 0.165: S401.4 21.89,11.42 v21.89,12.49 | S401.3 21.84,15.55 v21.84,16.49 | v10.43,20.82 | v10.43,20.82 U501.B4 | C503.1 6.55,47 v6.55,47.2 | v7.34,44.46 6.8,45 C504.1 6.8,45.06 U502.A9 | C507.1 16.32,47.18 v16.32,46.48 16.69,46.12 16.69,46.09 C506.1
  Top 0.2: LED401.4 19.65,7.15 v19.6,7.2
  Top 0.254: U203.43 7.49,10.32 v6.99,9.81 6.99,8.85 C201.1
  Top 0.305: U203.46 6.95,8.82 C201.1 6.92,7.94 v6.91,7.92 | U203.19 15.59,10.82 v15.69,10.72 | 10.23,6.43 U203.4 U203.3 9.73,6.93 10.23,6.43 | 10.23,6.43 v10.26,6.4 | C102.1 7.26,64.77 7.32,64.72 | U203.37 v7.06,13.32 v7.06,13.31 | U203.1 8.51,6.91 v8.13,6.91
  Bottom 0.127: C411.1 9.82,29.92 v9.82,29.83 9.82,29.93 C412.1 | C404.1 10.81,35.94 11.11,36.24 | C407.1 14.6,33.35 v15,33.75 | C415.1 14.13,34.38 v14.37,34.38 | C419.1 13.06,29.92 v13.06,29.85
  Bottom 0.152: R402.2 8.98,31.52 v9.23,31.76 | C420.1 13.34,30.15 13.06,29.87 12.73,30.2 C419.1 | C403.1 14.93,33.1 v14.99,33.1 | 8.22,34 C413.1 7.96,33.74 v7.86,33.74 7.92,33.74 C408.1 7.95,33.09 7.87,33.09 | C406.1 U401.J13 v12.41,35.69 12.31,35.59 C417.1 | C416.1 8.12,31.12 8.05,31.12 8.03,31.14 v7.85,31.14 | C410.1 U401.C7 v7.86,32.45 7.94,32.45 C409.1 7.93,33.09 7.87,33.09 | 7.87,33.09 v7.85,33.09 | C404.1 11.11,36.25 v11.11,36.32
  Bottom 0.165: C508.1 v10.43,20.81 v10.43,20.82 | 11.11,36.24 C405.1
  Bottom 0.305: R202.1 12.72,16.28 v12.12,16.28 | C207.1 9.76,5.9 v10.26,6.4 | C101.1 6.88,62.12 v7,62 | v7.06,13.31 6.96,13.21 C214.1
  other vias: 4,60 5,60 7,60 8,60 4,58 4,57 5,56 6,56 7,56 8,56 9,58 9,60 5,59 6,59 7,59 8,59 9,59 8,64 8,65 8,62
  pour Route14 (rank 3): -12.85,73.91 -12.85,0 25.4,0 25.4,73.91
  pour Top (no thermals): 3,61 3,54 10,54 10,56 11,56 11,61
  pour Bottom: 4,60 4,55 9,55 9,60
  pour Top (no thermals): 6,62 9,62 9,65 6,65
  cutout Route14: 13.5,4.25 13.5,0 17.5,0 17.5,4.25
+5V  (via drill 0.2, 0.3)
  Top 0.15: Q101.2 11.4,59.35 | v1.92,64
  Top 0.165: R106.1 21.08,45.85 J302.3
  Top 0.305: v0.81,64.3 0.83,64.32 D601.1 0.83,65.83 v1.6,66.6 | v2.4,67.8 3.03,67.8 C601.1 3.17,67.69 U601.2 | 11.4,59.35 11.4,57.6 12.6,56.4 17.8,56.4 18.6,57.2 v21.2,57.2
  Top 0.406: 0.86,64.25 v0.81,64.3 | Q102.2 2.09,64.16 v1.92,64 1.5,64.42 R101.1
  pour Route14 (rank 2): -1.52,68.2 -1.52,62.8 5.2,62.8 5.2,64.2 20.2,64.2 20.2,44.6 25.34,44.6 25.34,73.6 18.8,73.6 18.8,65.6 7.6,65.6 7.6,68.2
+VBAT  (via drill 0.3, 0.35)
  Top 0.165: R104.2 19.75,53.15 19.85,53.15 21.59,51.41 J302.1
  Top 0.254: v22.05,67.72 22.05,67.02 C104.1
  Top 0.406: U102.3 v20.7,67.75 21.16,67.75 | 12.45,58.42 13.19,57.67 P101.1 | Q101.3 12.45,59.38
  Top 0.61: P101.1 16.53,57.67 v17.32,58.47
  Top 0.813: 12.45,59.38 12.45,58.42
  Route3 0.406: v20.7,67.75 20.7,67.36
  Route3 0.508: 20.7,67.36 20.7,67.16 20.8,67.06 20.8,63.85
  Route3 0.61: 20.8,63.85 20.8,61.95 v17.32,58.47 v17.32,57 19.17,55.15 20.52,55.15 21.59,54.08 J302.1
  other vias: 19.66,68.63 22.05,68.63
  pour Top: 12,58.66 12,56.51 17.6,56.51 17.6,58.66
  pour Top (no thermals): 17.32,67.46 22.5,67.46 22.5,69.14 17.32,69.14
  pour Route3: 19.35,69.14 19.35,67.51 22.5,67.51 22.5,69.14
+VBUS  (via drill 0.2, 0.3, 0.35)
  Top 0.15: Q604.2 5.5,53.55 v5.5,54 | Q101.1 11.52,60.62 R102.2 12.21,60.7 v12.25,60.75 | v12,66.5 12,66.23 C620.1 12.68,65.78 13.7,66.8
  Top 0.254: v16.51,68.83 U102.4 14.92,67.75 v14.86,67.69 14.62,67.45 14.62,66.8 | 14.62,66.8 C103.1 15.1,66.69 15.62,66.17 15.62,65.02 17.14,63.5 R103.1 | 14.62,66.8 v13.72,66.8
  Top 0.305: J601.1 12.75,69.49 12.75,68 | 12.75,68 v12.75,67.75 13.7,66.8 v13.72,66.8 | 12.75,68 v12.75,67.75 | U601.5 U601.6 v6.05,68.75 6.05,69.44 v6,69.5 | 12.75,68 v13.5,68
  Top 0.406: v0.75,69 0.83,68.92 D601.2 0.9,68 v1.5,68
  Route3 0.15: v12,66.5 12,61 v12.25,60.75 12.25,57.75 8.5,54 8.36,54 8.31,54.05 8,54.05 7.95,54 v5.5,54
  pour Route14: -0.05,73.66 -0.05,68.13 7.62,68.13 7.62,65.53 18.8,65.53 18.8,73.66
+VREF  (via drill 0.2)
  Top 0.102: U401.N1 14.67,28.2
  Top 0.127: v3.1,22.57 5.6,22.57 5.79,22.39 13.59,22.39 v14.68,23.48 | v3.56,56.1 3.47,56.01 3.2,56.01 | U401.N1 14.68,27.74 v14.77,27.65
  Top 0.152: 3.2,56.01 J301.3
  Bottom 0.127: v14.68,23.48 15.11,23.91 15.11,26.65 14.71,27.04 C423.1 14.68,27.56 v14.77,27.65 | v3.1,22.57 3.1,23.79 3.22,23.92 3.22,28.96 | 3.22,28.96 | v3.56,56.1 3.39,55.93 3.39,40.26 3.46,40.19 3.46,38.17 2.96,37.67 2.96,32.41 2.86,32.31 2.86,29.99 3.24,29.61 3.24,29.16 3.22,29.15 3.22,28.96
ADC1_IN3  (via drill 0.2)
  Top 0.152: U401.R2 17.64,28.87 17.87,28.63 18.43,28.63 18.65,28.41 18.65,28.12 v19.49,27.28
  Route3 0.152: 2.73,33.76 2.73,30.98 2.61,30.86 2.61,27.19 6.97,22.82 | J301.7 2.73,44.39 2.73,40.85 2.87,40.72
  Route3 0.165: 6.97,22.82 7.39,22.82 7.74,22.47 8.3,22.47 8.65,22.82 15.03,22.82 v19.49,27.28 | 2.87,40.72 3.07,40.51 3.15,40.51 3.46,40.19 3.46,39.75 3.15,39.44 3.15,38.94 2.73,38.52 2.73,36.58 2.73,33.76
ADC1_IN7  (via drill 0.2)
  Top 0.127: U401.R3 17.66,29.52
  Top 0.152: 17.66,29.52 17.7,29.56 18.05,29.56 18.81,28.8 18.81,28.73 19.18,28.36 19.24,28.36 v19.86,27.75
  Route3 0.127: 7,22.45 2.3,27.14
  Route3 0.152: 7,22.45 7.52,21.93 9.13,21.93 9.56,22.36 | J301.8 2.18,42.4 2.18,39.48 2.08,39.39 2.08,38.95 2.18,38.85 2.18,29.99 2.3,29.87 2.3,27.14
  Route3 0.165: v19.86,27.75 19.86,27.45 19.88,27.44 19.88,27.12 15.12,22.36 9.56,22.36
ADC1_IN10  (via drill 0.2)
  Top 0.127: 13.68,27.96 13.68,28.07 13.69,28.09 13.69,28.53 U401.M2
  Top 0.152: v13.62,26.67 13.62,27.48 13.62,27.49 13.62,27.8 13.68,27.86 13.68,27.96
  Top 0.165: 4.15,16.88 3.21,16.88 | 4.15,16.88 2.05,16.88 v1.96,16.8 | v13.96,16.09 13.15,16.09 12.37,16.88 4.15,16.88
  Bottom 0.127: 3,29.26 3,24.01 2.69,23.7 2.69,22.01 2.66,21.98 2.66,20.75 2.82,20.59
  Bottom 0.152: 13.96,23.4 13.96,23.41 13.96,24.27 14.04,24.35 14.04,24.67 13.96,24.75 13.96,26.33 | 2.45,29.81 2.62,29.64 | 2.62,29.64 3,29.26 | 2.45,29.81 2.62,29.64 | 2.45,30.12 | 2.45,30.12 2.45,30.02 | 2.45,30.02 2.45,29.81 | 1.27,39.55 2.45,38.37 2.45,30.12 | 2.45,30.02 2.45,30.12 | 2.45,30.12
  Bottom 0.165: 13.96,23.4 v13.96,16.09 | 1.27,39.55 J301.9 | v1.96,16.8 1.96,16.97 2.82,17.83 2.82,20.59 | v13.62,26.67 13.96,26.33
ADC1_IN11  (via drill 0.2)
  Top 0.127: v13.71,29.84 U401.M3
  Top 0.152: v10.47,21.91 2.31,21.91 v2.27,21.94
  Bottom 0.127: 1.27,38.1 J301.10 | 2.45,22.11 v2.27,21.94
  Bottom 0.152: v13.71,29.84 13.71,27.89 13.62,27.8 13.62,27.2 13.24,26.83 13.24,25.58 10.47,22.81 v10.47,21.91 | 2.45,22.11 2.45,25 2.46,25.01 2.46,26.02 2.2,26.29 2.2,27.31 2.46,27.57 2.46,29.29 2.13,29.62 2.13,30.16 2.2,30.22 | 2.2,30.22 2.18,30.21 | 2.2,30.22 2.2,31.08 1.91,31.37 1.91,32.47 2.2,32.76 2.2,37.17 1.27,38.1
CAN1_RX  (via drill 0.2)
  Top 0.127: U401.A5 5.92,30.82
  Top 0.165: v3.88,31.42 4.55,31.42 4.89,31.08 5.65,31.08 5.92,30.82 | v4.39,20.3 4.24,20.45 J301.17
  Bottom 0.127: v4.4,20.31 4.4,22.89 4.39,22.89 4.39,23.2 4.4,23.21 4.4,26.62
  Bottom 0.152: v3.88,31.42 4.33,30.97 4.33,26.69 4.4,26.62
  Bottom 0.165: v4.4,20.31 v4.39,20.3
CAN1_TX  (via drill 0.2)
  Top 0.127: U401.B4 7.5,30.17 7.2,29.87 7.02,29.87 7.01,29.85 6.75,29.85 6.74,29.87 6.17,29.87
  Top 0.152: 4.9,29.26 5.24,29.6 5.57,29.6 5.84,29.87 6.17,29.87
  Top 0.165: v1.38,29.31 1.44,29.26 4.9,29.26
  Bottom 0.127: J301.18 0.29,18.89 0.29,23.32 1.58,24.61 1.65,24.61 2.15,25.11 2.2,25.11
  Bottom 0.152: 2.2,28.35 2.2,28.5 v1.38,29.31
  Bottom 0.165: 2.2,25.11 2.2,25.91 1.94,26.18 1.94,27.42 2.2,27.68 2.2,28.35
DAC_OUT1  (via drill 0.2)
  Top 0.127: J301.5 3.27,50.93 4.48,52.14 | v19.39,48.78 15.3,52.86 11.43,52.86 | U401.N4 v15,29.84 v15.01,29.84
  Top 0.152: 4.48,52.14 8.3,52.14 9.01,52.85 9.72,52.85 9.73,52.86 11.43,52.86
  Route3 0.152: v19.44,29 18.59,29 18.02,29.56 15.29,29.56 v15.01,29.84
  Bottom 0.127: 19.78,37.18 20.05,36.91 20.05,36.33 20.21,36.17 20.21,36.02 20.21,35.86 20.09,35.74 20.09,32.15
  Bottom 0.152: v19.39,48.78 19.39,37.57 19.78,37.18 | 20.09,32.15 20.01,32.08 20.01,31 19.09,30.07 19.09,29.48 19.44,29.13 v19.44,29
DAC_OUT2  (via drill 0.2)
  Top 0.127: 19.51,28.62 20.01,28.11 20.02,28.11 20.33,27.8 20.33,27.44 | U401.P4 15.65,29.85 17.36,29.85
  Top 0.15: 17.25,29.85 17.36,29.85 18.78,29.85 19.09,29.54 19.09,29.18 19.06,29.15 19.06,28.84 19.28,28.62 19.51,28.62 | 20.33,27.44 19.97,27.08 v19.97,26.28
  Route3 0.152: 0.39,46.65 0.39,46.21 0.39,25.12 0.61,24.9
  Route3 0.165: J301.6 1.27,47.53 0.39,46.65 | 0.61,24.9 1.64,23.87 4.65,23.87 5.55,22.97 5.55,22.59 6.68,21.47 15.16,21.47 15.95,22.26 19.03,22.26 20.24,23.46 20.24,26.02 v19.97,26.28
EN_3V3
  Top 0.165: R106.2 20.83,47.63 J302.2 18.22,51.75 18.14,51.84 Q103.1
EN_3V3_L  (via drill 0.2)
  Top 0.15: Q604.1 5.78,53.02 6.8,54.05 9.2,54.05 v9.91,53.34 | R101.2 1.96,65 Q102.1
  Top 0.165: Q103.3 18.03,53.49 11.45,53.49 11.27,53.32 10.95,53.32 10.93,53.34 v9.91,53.34 | R101.2 1.52,65.03 v1.52,65.38
  Route3 0.165: v1.52,65.38 2.11,65.38 2.37,65.13 7.51,65.13 7.82,65.44 8.78,65.44 v8.99,65.23
  Bottom 0.152: v8.99,65.23 8.99,60.85 9.7,60.15
  Bottom 0.165: v9.91,53.34 9.91,54.73 9.7,54.94 9.7,60.15
ESP32:CHIP_ANT_50OHM
  Top 0.15: C205.1 9.53,2.14
  Top 0.152: 9.53,2.14 8.7,2.14 C220.1 | 10.48,2.14 arc-90 L201.2
  Top 0.165: C205.1 9.51,2.03 L201.2
ESP32:EXTANT_50OHM
  Top 0.152: ANT202.SIG 2.94,5.46 3.28,5.46 arc-90 C219.1
ESP32:FLASH_VDD  (via drill 0.2)
  Top 0.165: U203.26 13.72,14.01 13.72,14.48 v13.41,14.78
  Bottom 0.165: v13.41,14.78 13.05,15.14 12.86,15.14
  Bottom 0.2: 12.86,15.14 R202.2
ESP32:GPIO2
  Top 0.165: U203.22 16.5,12.32 R206.1
ESP32:GPIO26  (via drill 0.2)
  Top 0.152: v6.22,4.83 6.65,4.83 6.83,4.64
  Top 0.165: 6.83,4.64 U202.6 | U203.15 15.41,8.82 15.7,8.53 v15.7,7.77
  Route3 0.152: v6.22,4.83 6.22,5.24 6.22,5.56 6.22,5.84 8.61,8.23 8.83,8.46 9.53,8.46 10.72,7.26
  Route3 0.165: 10.72,7.26 11.02,7.26 14.05,7.26 14.55,7.77 v15.7,7.77
ESP32:GPIO27  (via drill 0.2)
  Top 0.152: v9.35,4.7 8.21,4.7 arc90 U202.4
  Top 0.165: U203.16 14.93,9.3 15.45,9.3 16.15,8.6 v16.15,8.38
  Route3 0.165: v9.35,4.7 10.24,5.59 11.26,5.59 11.31,5.54 12.95,5.54 14.5,7.09 15.57,7.09 16.15,7.67 v16.15,8.38
ESP32:LNA_50OHM
  Top 0.165: C221.2 arc90 9.25,6.77 9.23,6.79 U203.2
ESP32:MTCK  (via drill 0.2)
  Top 0.152: U203.20 15.69,11.32 v15.75,11.38
  Bottom 0.152: v15.75,11.38 14.63,10.26 8.23,10.26 4.98,10.26 TP201.1
ESP32:MTDI  (via drill 0.2)
  Top 0.152: U203.18 14.97,10.26 15.65,10.26 v15.75,10.16
  Bottom 0.152: v15.75,10.16 15.44,9.86 13.82,9.86 13.34,9.37 13.34,9.29 12.96,8.91 9.9,8.91 9.67,9.14 TP203.1
ESP32:MTDO  (via drill 0.2)
  Top 0.152: U203.21 15.68,11.82 v15.75,11.89
  Bottom 0.152: v15.75,11.89 13.61,11.89 12.78,11.05 5.63,11.05 5.41,11.27 5.41,11.35 TP204.1
ESP32:MTMS  (via drill 0.2)
  Top 0.152: U203.17 15.51,9.82 15.77,9.55 v15.77,9.53
  Bottom 0.152: v15.77,9.53 14.61,9.53 12.5,7.42 4.52,7.42 TP205.1
ESP32:N$3
  Top 0.152: U203.8 C203.2
ESP32:N$4
  Top 0.152: C202.1 10.73,5.92 U203.5
ESP32:N$5
  Top 0.152: U203.6 11.23,5.92 C202.2
ESP32:N$7
  Top 0.152: U203.7 C203.1
ESP32:N$8
  Top 0.152: C206.1 12.57,1.89 | 12.57,1.89 13.57,1.89 arc-90 ANT201.1 | L201.1 12.43,2.03 arc-90 12.57,1.89
ESP32:N$10
  Top 0.165: U203.41 7.12,11.32 R203.1
ESP32:N$13
  Top 0.152: U202.3 8.14,2.2 arc90 C220.2
ESP32:N$14
  Top 0.152: C219.2 6.83,2.92 arc90 U202.1
ESP32:N$15
  Top 0.152: C221.1 U202.5 arc-90 U202.5
ESP32_BOOT_L  (via drill 0.2)
  Top 0.127: U401.E3 v9.16,29.2
  Top 0.165: U203.23 15.68,12.82 | 15.68,12.82 v15.7,12.8 | R204.2 16.12,12.82 15.68,12.82
  Bottom 0.127: 9.42,28.95 v9.16,29.2
  Bottom 0.152: 9.77,27.51 9.77,28.03 9.42,28.38 9.42,28.95 | TP202.1 v11.5,15.49 | 12.27,14.31 13.86,12.72 13.97,12.72
  Bottom 0.165: 9.77,27.51 9.77,17.22 v11.5,15.49 | v15.7,12.8 15.62,12.72 13.97,12.72 13.86,12.72 | TP202.1 12.27,14.91 12.27,14.31
ESP32_RESET_L  (via drill 0.2)
  Top 0.102: U401.K1
  Top 0.15: 15.54,6.96 v16.75,8.17 | v13.66,24.51 13.68,24.53 13.68,25.36 12.83,26.21 12.83,26.94 12.67,27.09 12.67,27.41 12.73,27.46 U401.K1 | R205.1 14.23,14.98 TP206.1 | 14.96,6.96 14.34,6.34 13.97,6.34
  Top 0.152: 15.54,6.96 14.96,6.96 | 12.73,6.32 13.07,5.98 13.39,5.98 13.5,6.09 C218.1 13.97,6.34
  Top 0.165: 12.73,6.32 U203.9
  Bottom 0.152: v13.66,24.51 13.66,16.34 13.57,16.25 13.57,15.45 | TP206.1 | TP206.1 14.13,14.89 | 16.15,9.65 16.15,9.25 16.75,8.66 v16.75,8.17
  Bottom 0.165: 13.57,15.45 14.13,14.89 15.83,13.19 15.86,13.19 16.15,12.89 16.15,9.65
  other vias: 14.22,14.99
ESP32_UART5  (via drill 0.2)
  Top 0.102: 8.45,37.73 8.49,37.68
  Top 0.127: 8.49,35.77 8.49,36.83 8.49,36.97 | 8.49,36.97 8.5,36.98 8.49,36.97 | 8.49,37.68 8.49,37.34 8.49,36.97
  Top 0.15: 8.39,38.93 8.39,37.78 8.45,37.73
  Top 0.152: v4.27,41.69 5.63,41.69 8.39,38.93
  Top 0.165: U401.D12 8.49,35.7 8.49,35.77 | R203.2 6.5,11.43 v5.79,11.43
  Bottom 0.127: 3.81,21.86 3.81,17.61 | v4.27,41.69 4.27,36.59 3.88,36.2
  Bottom 0.152: 3.81,17.61 6.35,15.07 TP208.1 v6.35,15.11 | 3.56,31.19 4.05,30.7 4.05,30.23 4.05,30.02 | 3.56,31.64 3.56,35.88 3.88,36.2
  Bottom 0.165: 3.56,31.64 3.5,31.58 3.5,31.26 3.56,31.19 | 3.81,21.86 4.05,22.1 4.05,28.55 4.05,30.02 | v5.79,11.43 5.79,12.41 5.1,13.1 5.1,13.99 TP208.1
FLASH_CLK  (via drill 0.2)
  Top 0.152: v15.86,20.63 15.34,20.63 14.49,19.77 11.24,19.77 10.89,19.42 10.89,18.73 10.47,18.3 U501.B2 | U401.M6 v14.36,31.14
  Bottom 0.127: v14.36,31.14 14.54,30.95
  Bottom 0.152: 14.54,30.95 15.49,30 15.49,28.75 | 15.49,28.75 15.49,28.29 | 15.49,28.29 15.57,28.2 | 15.57,28.2 15.8,27.98 | 15.8,27.98 15.9,27.88 15.9,20.67 v15.86,20.63 | 15.57,28.2 15.5,28.28 | 15.49,28.75 15.49,28.29 | 15.49,28.29 15.8,27.98
FLASH_CS_L  (via drill 0.2)
  Top 0.15: U401.R12 16.69,35.37
  Top 0.165: 16.69,35.37 17.07,35.74 v17.07,35.77 | v19.81,16.81 19.77,16.77 13.25,16.77 12.83,17.19 12.83,17.64 12.65,17.82 11.91,17.82 U501.C2
  Bottom 0.152: 19,21.33 19.81,20.52
  Bottom 0.165: 19.81,20.52 v19.81,16.81 | v17.07,35.77 17.09,35.74 17.09,31.98 17.45,31.62 17.45,30.76 18.39,29.81 18.39,29.57 18.52,29.45 18.52,28.93 19,28.45 19,21.33
FMC_A0  (via drill 0.2)
  Top 0.15: v9.2,27.38 9.2,28.03 9.15,28.08 9.15,28.54 U401.E2
  Top 0.152: v10.58,50.65 9.84,50.65 U502.H7
  Route3 0.152: 6.06,37.74 4.88,36.57 4.88,36.16
  Route3 0.165: v10.58,50.65 10.06,50.12 9.07,50.12 8.54,49.6 5.92,49.6 5.31,48.99 5.31,46.51 5.1,46.3 5.1,45.98 5.31,45.77 5.31,44.76 5.54,44.53 5.54,44.28 6.06,43.76 6.06,37.74 | v9.2,27.38 9.2,28.02 4.88,32.34 4.88,36.16
FMC_A1  (via drill 0.2)
  Top 0.152: U502.H8 8.65,50.28 v8.65,50.25 | U401.H3 v11.76,29.2
  Route3 0.165: v8.65,50.25 8.23,50.67 7.52,50.67 7.29,50.9 5.05,50.9 4.51,50.37 4.51,44.69 4.99,44.22 4.99,44.03 5.32,43.7 5.32,38.8 4.23,37.71 4.23,31.99 4.54,31.69 4.54,31.65 6.18,30 6.18,26.45 6.78,25.86 8.41,25.86 8.44,25.9 9.2,25.9 9.23,25.86 10.93,25.86 11.4,26.33 11.4,26.99 11.76,27.35 v11.76,29.2
FMC_A2  (via drill 0.2)
  Top 0.127: 11.54,28.75 11.74,28.55 11.74,27.21 11.8,27.15
  Top 0.152: U502.J8 v8.6,51.89 v8.6,51.9 | v12.04,25.6 11.8,25.84 11.8,27.15 | 11.54,28.75 U401.H2
  Route3 0.165: v8.6,51.9 4.85,51.9 4.2,51.25 4.2,44.63 4.72,44.11 4.72,43.78 4.69,43.76 4.69,39.37 3.92,38.6 3.92,31.93 4.27,31.58 4.27,31.42 4.56,31.13 4.56,27.2 6.76,25 7.08,25 7.47,25.38 7.7,25.38 7.73,25.41 11.84,25.41 v12.04,25.6
FMC_A3  (via drill 0.2)
  Top 0.127: U401.J2 12.08,28.66 12.39,28.35 12.39,28.03 12.45,27.98 12.45,27.52 12.43,27.5 12.43,27 12.45,26.98 v12.45,26.49
  Top 0.152: v10.45,51.95 9.96,51.46 U502.J7
  Route3 0.165: v10.45,51.95 10.05,52.35 4.45,52.35 3.42,51.32 3.42,45.98 3.6,45.8 3.6,44.18 3.43,44.01 3.43,42.85 3.6,42.67 3.6,41.67 4.37,40.9 4.37,39.79 3.67,39.09 3.67,38.73 3.49,38.55 3.49,31.2 4.11,30.59 4.11,27 5.99,25.12 6.27,25.12 6.65,24.73 8.46,24.73 8.67,24.52 11.54,24.52 12.45,25.43 v12.45,26.49
FMC_A4  (via drill 0.2)
  Top 0.127: U401.J3 v12.41,29.19
  Top 0.152: v13.05,52.35 13.03,52.33 U502.J3
  Route3 0.152: v12.41,29.19 12.41,27.47 12.41,27.32 | v13.05,52.35 13.7,53 16.18,53
  Route3 0.165: 16.18,53 20.11,49.08 20.11,43.76 20.45,43.42 20.45,33.83 20.3,33.68 20.3,28.8 16.22,24.72 14.15,24.72 12.9,25.98 12.9,26.59 12.41,27.08 12.41,27.47
FMC_A5  (via drill 0.2)
  Top 0.127: U401.K3 12.73,29.38 13.05,29.06 v13.05,27.25
  Top 0.152: U502.J2 13.83,51.53 v14.25,51.95
  Route3 0.165: v14.25,51.95 14.62,52.31 15.25,52.31 15.35,52.22 16.49,52.22 18.8,49.91 18.8,44.49 19.62,43.67 19.62,36.34 19.44,36.17 19.44,35.85 19.46,35.84 19.46,33.91 20.03,33.34 20.03,29.04 19.6,28.61 18.46,28.61 18.43,28.64 18.11,28.64 17.88,28.41 17.88,28.09 15.64,25.85 15.04,25.85 14.84,25.64 14.52,25.64 14.3,25.85 13.78,25.85 13.16,26.46 13.16,27.14 v13.05,27.25
FMC_A6  (via drill 0.2)
  Top 0.127: U401.P6 15.67,31.13 16.11,31.13 16.22,31.02 18.76,31.02 19,31.26 v19.43,31.26
  Top 0.152: U502.H3 12.89,50.66 v12.49,51.05
  Route3 0.165: v12.49,51.05 12.92,51.48 16.83,51.48 18.52,49.79 18.52,44.97 17.74,44.19 17.74,41.53 19.26,40.01 19.26,36.36 19.18,36.28 19.18,35.74 19.19,35.73 19.19,33.8 19.71,33.28 19.71,31.54 v19.43,31.26
FMC_A7  (via drill 0.2)
  Top 0.152: v14.24,51.07 U502.H2 | U401.N6 v15.01,31.14
  Route3 0.152: v15.01,31.14 15.1,31.05 15.59,31.05 16.33,30.31
  Route3 0.165: v14.24,51.07 14.26,51.05 16.15,51.05 17.99,49.2 17.99,48.38 18.25,48.12 18.25,46.54 17.99,46.28 17.99,45 17.43,44.43 17.43,44.14 17.45,44.12 17.45,41.39 18.7,40.14 18.93,39.91 18.93,36.4 18.91,36.39 18.91,35.63 18.93,35.62 18.93,32.59 19.04,32.48 19.04,30.97 18.39,30.31
  Route3 0.2: 18.39,30.31 16.33,30.31
FMC_A8  (via drill 0.2)
  Top 0.15: U401.R7 16.5,32.12 16.62,32.12
  Top 0.152: U502.H1 v15.35,50.65 | v18.66,32.32 18.66,32.17 18.6,32.12 18.45,32.12 16.5,32.12
  Route3 0.152: 17.01,48.99 16.78,49.22 v15.35,50.65
  Route3 0.165: 17.24,46.36 17.24,46.25 | 17.24,46.25 17.24,46.12 17.25,46.11 17.24,46.09 17.24,46.06 | 17.24,46.36 17.24,46.25 | 17.24,46.25 17.24,46.06 | 17.24,46.06 17.16,45.99 17.16,44.03 17.18,44.01 17.18,41.28 17.19,41.27 17.19,40.72 18.66,39.25 18.66,36.51 18.65,36.5 18.65,35.52 18.66,35.51 18.66,32.33 v18.66,32.32 | 17.01,48.99 17.99,48.01 17.99,46.65 17.53,46.65 17.24,46.36
FMC_A9  (via drill 0.2)
  Top 0.127: U401.P7 15.65,31.79 16.2,31.79
  Top 0.15: v13.38,49.41 13.03,49.76 U502.G3 | U401.P7 15.38,32.12 | 16.05,31.79 16.2,31.79 16.45,31.79
  Top 0.152: v17.92,31.55 17.68,31.79 17.27,31.79 17.22,31.84 16.91,31.84 16.85,31.79 16.45,31.79
  Route3 0.165: v17.92,31.55 17.92,31.64 16.62,32.94 16.62,36.24 17.33,36.95 17.33,39.78 16.66,40.45 16.66,40.85 16.65,40.86 16.65,43.42 16.29,43.78 16.29,45.9 16.71,46.32 16.71,48.23 15.53,49.41 v13.38,49.41
FMC_A10  (via drill 0.2)
  Top 0.152: v7.68,51.05 7.83,51.05 U502.H9 | U401.N7 14.97,31.82 v14.97,31.82
  Route3 0.152: v14.97,31.82 15.19,31.82 16.19,30.81 17.8,30.81 | 16.63,48.81 15.57,49.87 12.25,49.87 11.07,51.05 v7.68,51.05
  Route3 0.165: 16.63,48.81 16.97,48.47 16.97,46.17 16.89,46.1 16.89,43.92 16.92,43.9 16.92,41.17 16.93,41.16 16.93,40.61 18.3,39.24 18.3,35.04 18.36,34.98 18.36,33.38 18.19,33.21 18.19,31.83 18.3,31.71 18.3,31.31 17.8,30.81
FMC_A11  (via drill 0.2)
  Top 0.15: U401.M7 v14.36,31.79
  Top 0.152: U502.G2 14.28,49.41 14.78,49.41 15.15,49.04
  Top 0.165: 15.15,49.04 v15.15,48.55
  Route3 0.152: v14.36,31.79 14.91,32.35 15.65,32.35 16.38,31.62 16.38,31.61 16.91,31.08 17.28,31.08 17.45,31.25
  Route3 0.165: 17.45,31.25 17.45,31.62 16.2,32.87 16.2,37.66 16.59,38.04 16.59,38.36 16.2,38.74 16.2,41.21 15.93,41.48 15.93,47.42 16.22,47.7 16.22,48.02 15.7,48.55 v15.15,48.55
FMC_A12  (via drill 0.2)
  Top 0.127: v13.35,39.25 13.35,38.72 13.33,38.7 13.33,37.36 U401.L15
  Top 0.152: 15.83,49.46 15.43,49.86 U502.G1
  Top 0.165: v15.83,47.86 15.83,48.71 15.83,49.46
  Route3 0.165: v13.35,39.25 15.67,41.57 15.67,46.81 15.4,47.08 15.4,47.67 15.6,47.86 v15.83,47.86
FMC_A13  (via drill 0.2)
  Top 0.152: U502.E2 13.5,47.93 v13.5,47.87
FMC_A14  (via drill 0.2)
  Top 0.127: v12.3,38 12.3,37.54 12.39,37.45 12.39,37 U401.K14
  Top 0.152: U502.G7 10.85,48.84 10.85,48.63 v10.9,48.63
  Route3 0.165: v10.9,48.63 10.9,48.41 10.97,48.33 10.97,47.32 10.82,47.17 10.82,41.16 10.9,41.09 10.9,40.77 10.82,40.7 10.82,39.79 12.3,38.32 v12.3,38
FMC_A15  (via drill 0.2)
  Top 0.127: U401.K13 v13.06,36.34
  Top 0.152: 10.8,49.82 10.8,49.49 v10.83,49.49 | 10.4,50.22 9.39,50.22 U502.G8
  Top 0.165: 10.8,49.82 10.4,50.22
  Route3 0.152: 13.06,38.04 v13.06,36.34 | v10.83,49.49 11.45,48.88 11.45,44.93
  Route3 0.165: 11.45,44.93 11.45,42.88 11.19,42.62 11.19,40.3 13.06,38.43 13.06,38.04
FMC_CAS_L  (via drill 0.2)
  Top 0.127: U401.B7 7.22,32.43 6.75,32.43 6.71,32.39 6.37,32.39
  Top 0.152: 6.37,32.39 5.57,33.19 v5.57,34.1
  Top 0.165: U502.F7 9.83,49.1 v9.46,49.47 | 6.53,32.39 6.37,32.39
  Route3 0.165: v9.46,49.47 9.05,49.07 8.51,49.07 8.21,48.77 7.51,48.77 7.16,48.43 7.16,44.83 6.89,44.56 6.89,38.38 6.62,38.11 6.62,37.79 6.89,37.52 6.89,35.42 v5.57,34.1
FMC_CKE_L  (via drill 0.2)
  Top 0.127: U401.F4 v10.46,29.84
  Top 0.152: U502.F3 12.96,49.06 12.68,48.78 12.68,48.66 v12.76,48.66
  Route3 0.152: 6.32,37.59 5.15,36.42 5.15,35.88
  Route3 0.165: v12.76,48.66 11.27,50.15 10.78,50.15 10.39,49.77 9.71,49.77 9.62,49.86 9.3,49.86 9.2,49.77 9.15,49.77 9.15,49.74 8.74,49.33 7.05,49.33 5.86,48.14 5.86,46.32 5.88,46.3 5.88,45.98 5.86,45.96 5.86,44.71 6.32,44.24 6.32,37.59 | 5.15,35.88 5.15,33.3 8.35,30.1 9.54,30.1 9.66,30.22 10.08,30.22 v10.46,29.84
FMC_CLK  (via drill 0.2)
  Top 0.127: 11.84,37.79 11.8,37.75 11.77,37.72 11.77,37 U401.H14
  Top 0.152: U502.F2 13.42,48.65 v13.4,48.65 | v11.84,40.88 11.84,37.79
  Route3 0.152: v13.4,48.65 12.97,48.22 12.97,44.74 11.9,43.67 11.9,40.95 v11.84,40.88
FMC_CS_L  (via drill 0.2)
  Top 0.152: U502.G9 7.76,49.85 7.64,49.97 v7.64,50.01 | U401.G4 v11.1,29.84 v11.11,29.84
  Route3 0.152: 11.13,29.46 11.11,29.49 v11.11,29.84
  Route3 0.165: 11.13,29.82 11.13,29.46 11.13,27.52 10.6,26.99 9.36,26.99 9.33,26.96 8.5,26.96 8.29,27.16 8.29,28.41 4.62,32.09 4.62,37.62 5.72,38.72 5.72,43.67 5.25,44.14 5.25,44.33 4.84,44.74 4.84,49.29 5.56,50.01 v7.64,50.01
FMC_D0  (via drill 0.2)
  Top 0.127: U401.M14 14.03,36.87 13.7,37.2 v13.7,38.55
  Top 0.165: U502.A8 9.03,44.61 9.07,44.57 9.07,44.25 9.05,44.23 v9.05,42.92
  Bottom 0.152: v9.05,42.92 10.66,41.31 10.67,41.31 13.43,38.55 v13.7,38.55
FMC_D1  (via drill 0.2)
  Top 0.127: 13.05,38.15 13.05,37.43 | 13.05,37.43 13.05,37 U401.L14 | 13.05,39.01 13.05,37.43
  Top 0.152: U502.B9 8.35,45.86 8.68,45.53 8.68,44.91 v8.68,44.41 | v13.38,39.95 13.04,39.61 13.04,39.47 12.97,39.41 12.97,39.09 13.05,39.01